# Altium PCB MS_PCB.PcbDoc (part 1 of 3)
Units mil, origin at the board's own origin, x right, y up, seen from the top; angles counter-clockwise.
Board outline 1232.38 x 1705 mil, 2 copper layers (Top Layer, Bottom Layer), stack 33 mil thick; 84 components, 60 nets, 313 pads, 105 vias.
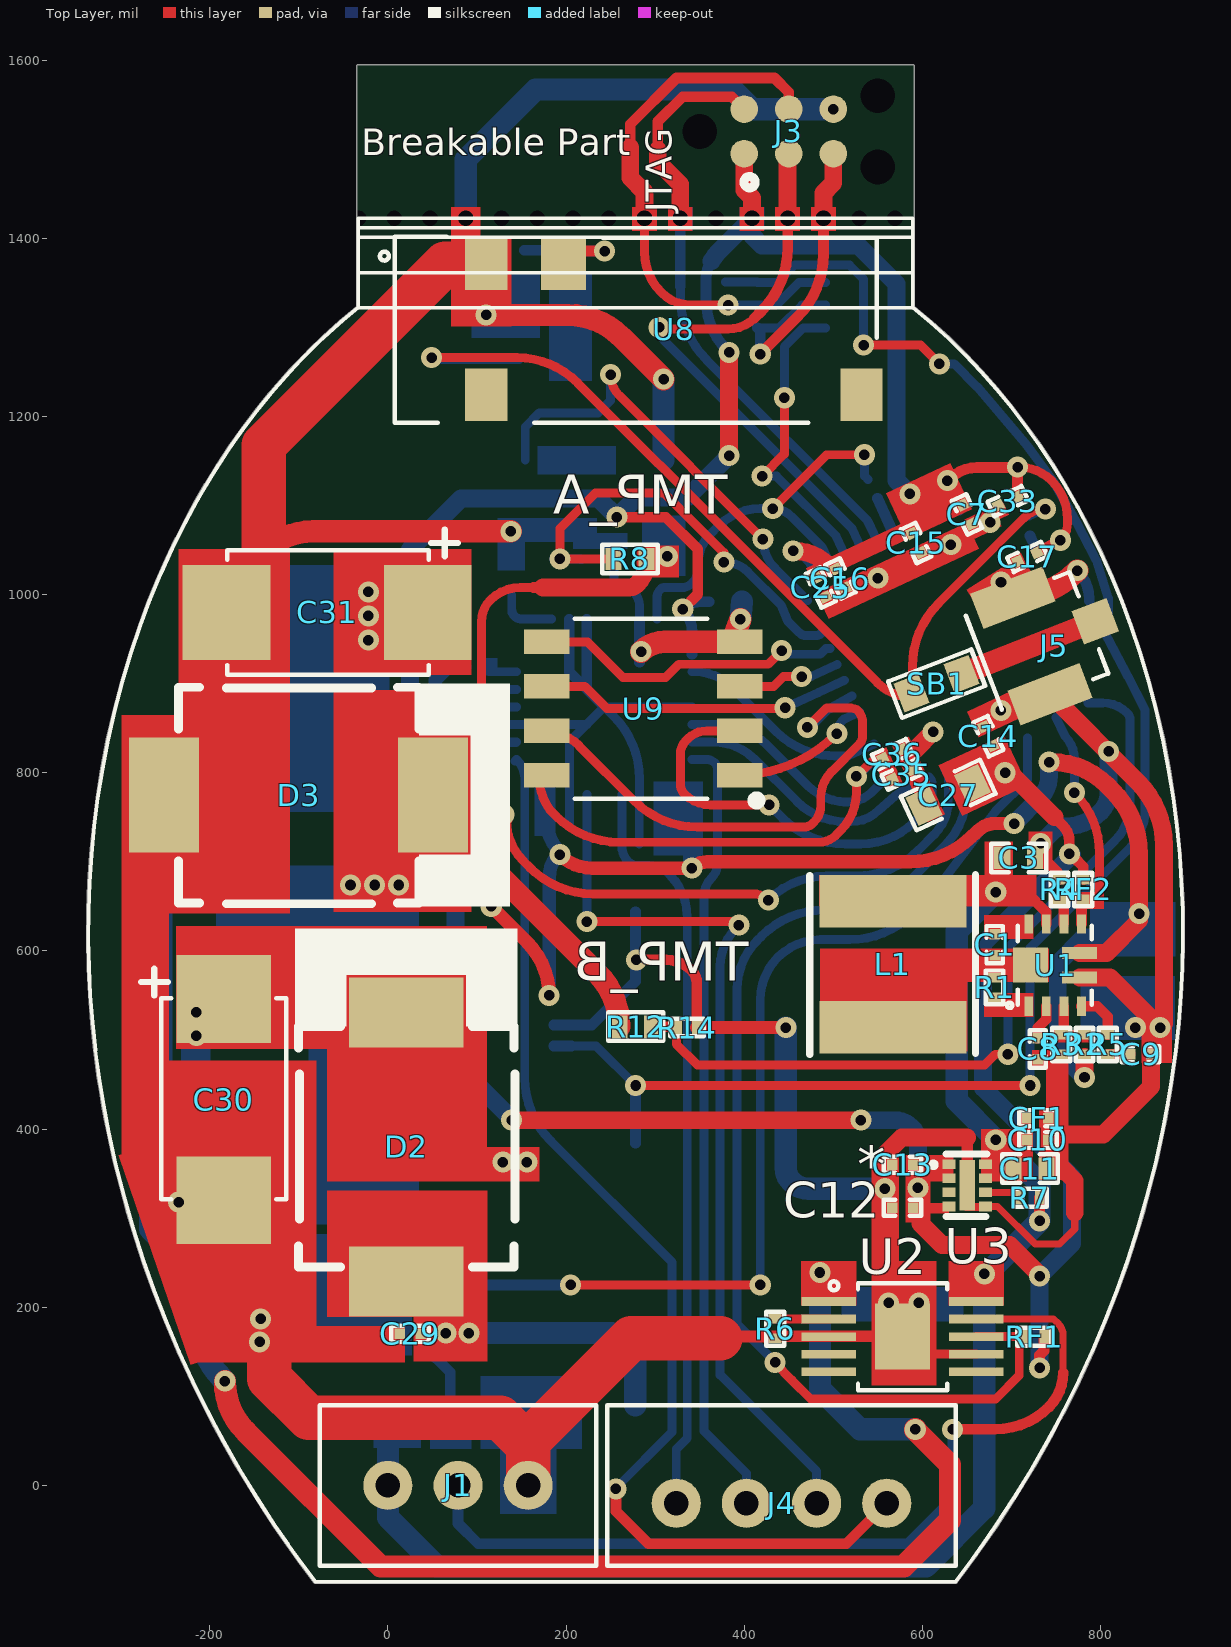
[diagram p0: Top Layer view]
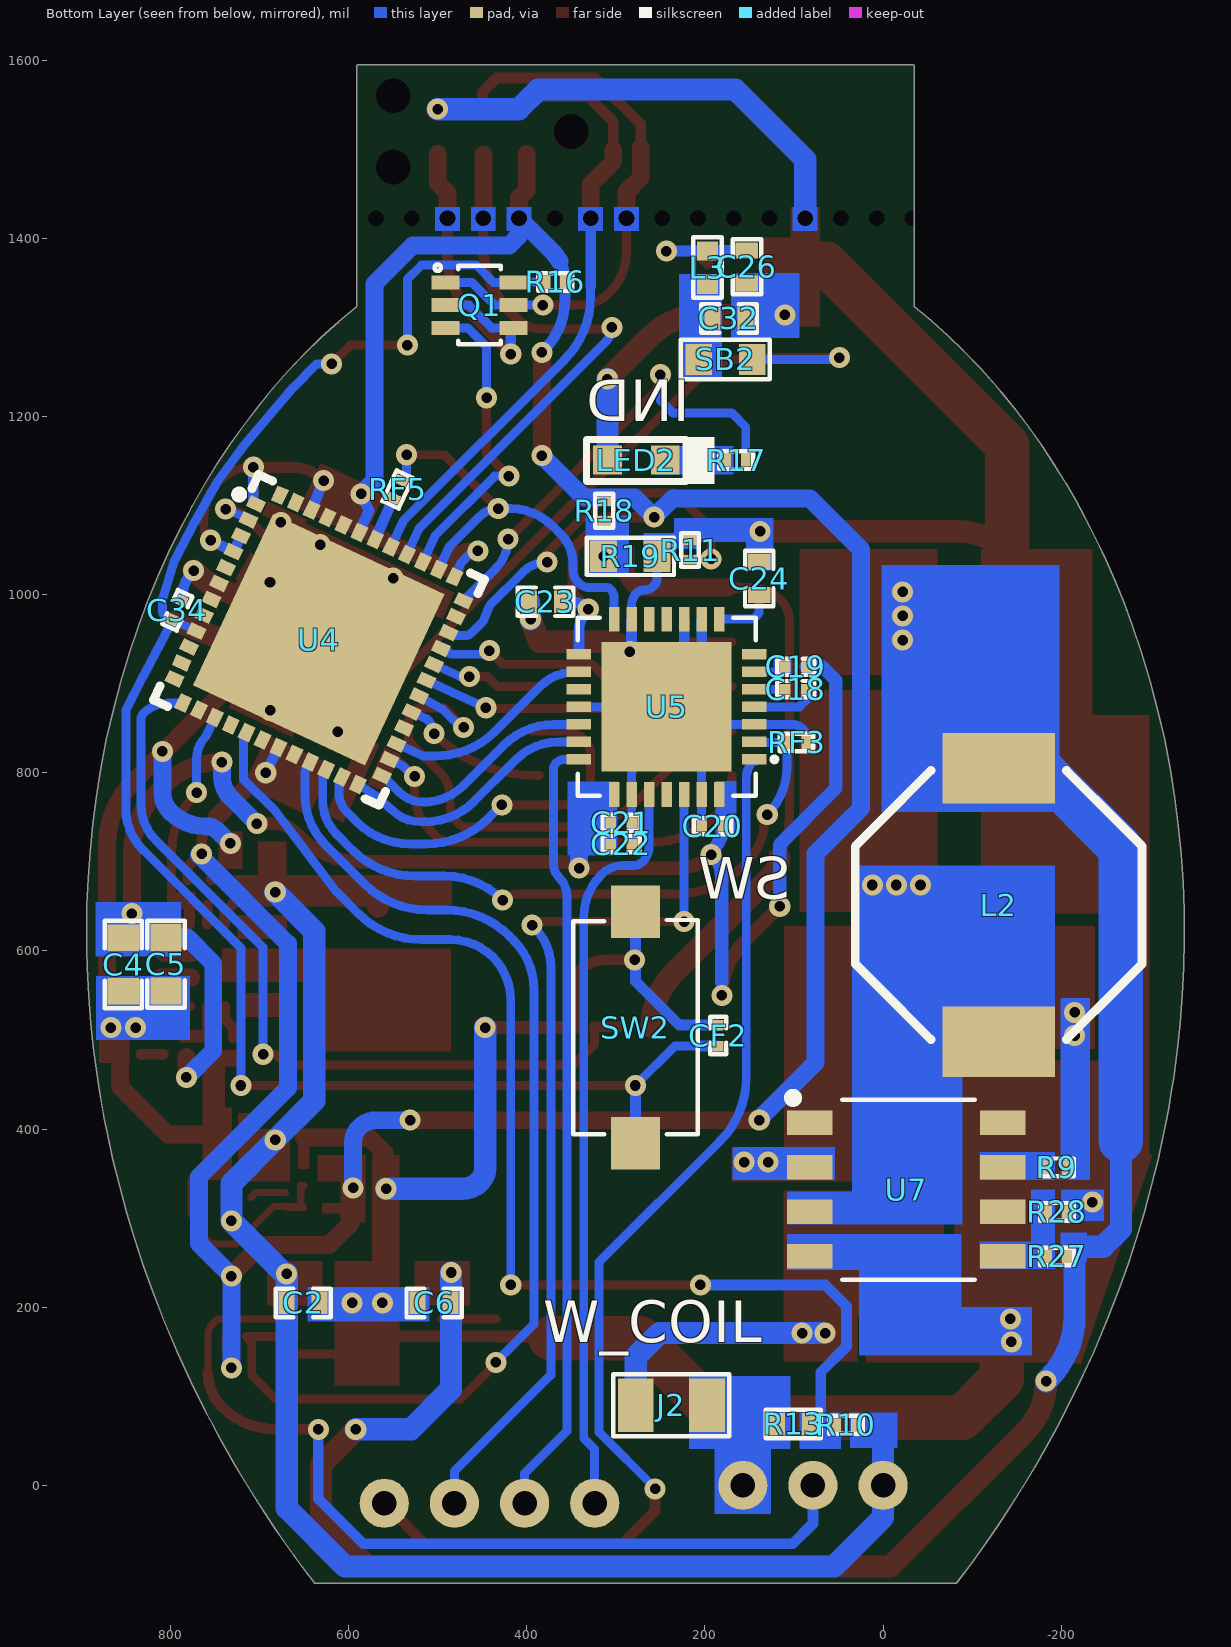
[diagram p1: Bottom Layer view, seen from below]
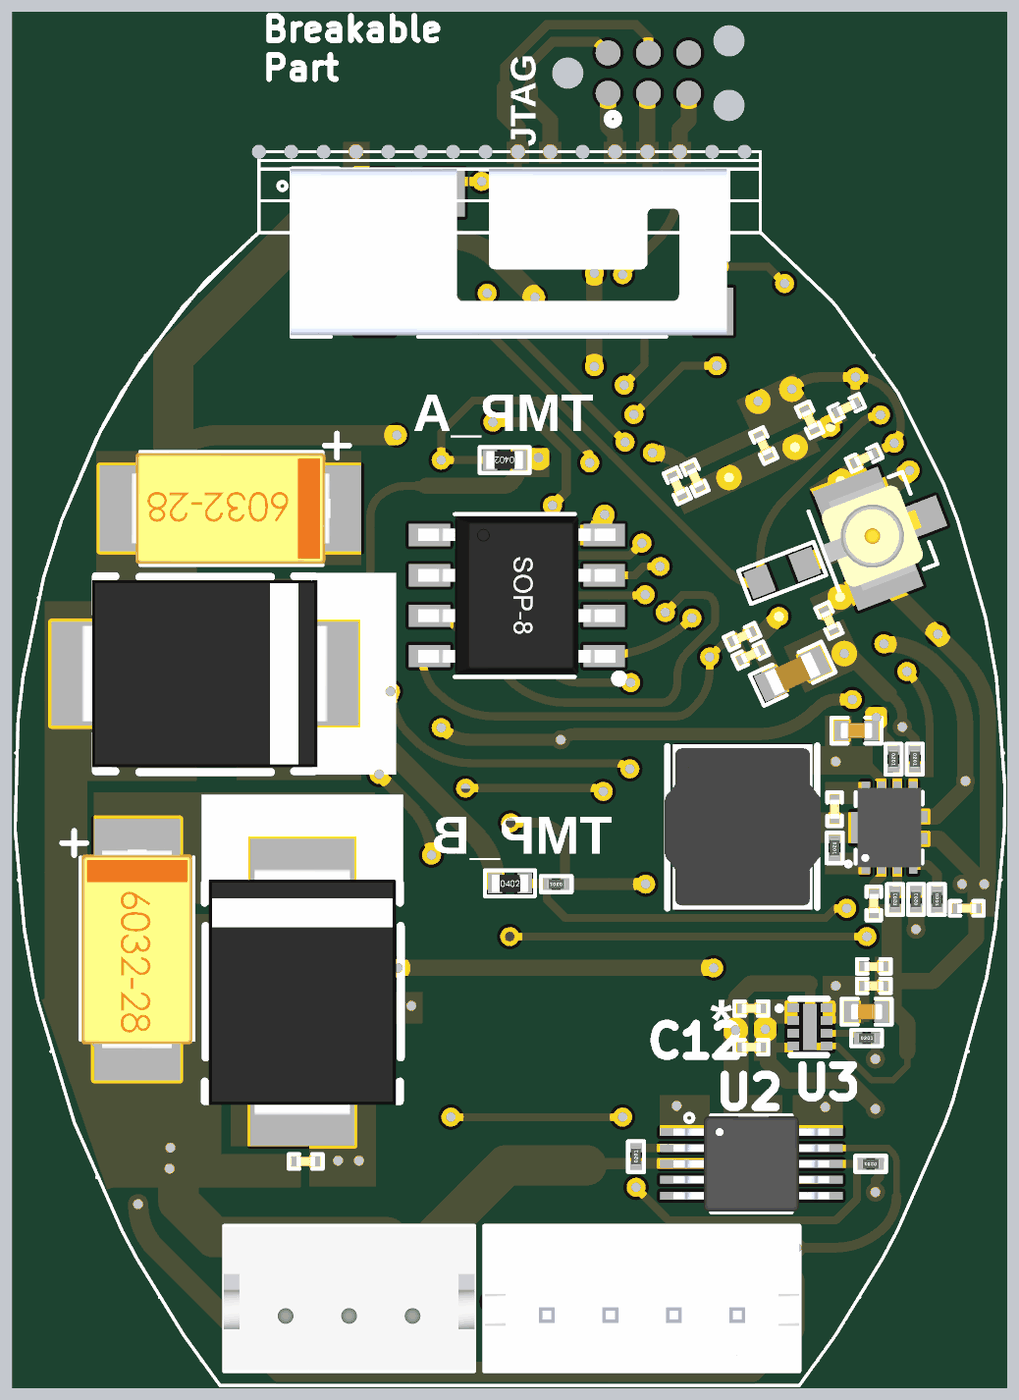
[diagram p3: 3D render of the assembled board from above, using the file's embedded part models]
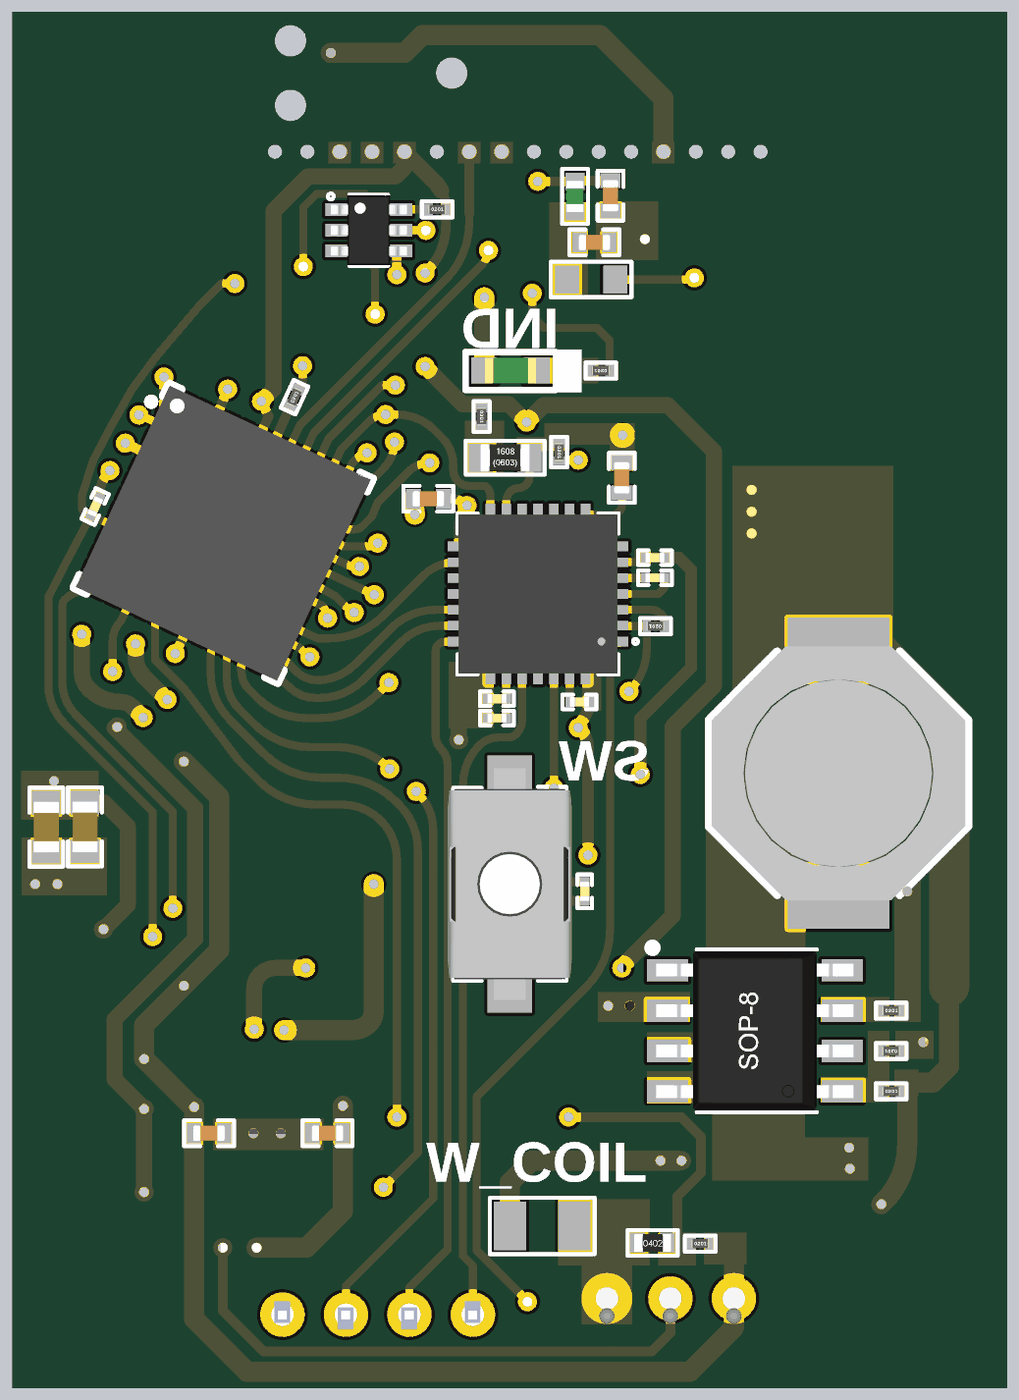
[diagram p4: 3D render of the assembled board from below, using the file's embedded part models]

## Layer stack, top to bottom
Top Solder: solder mask 3, Solder Resist, Dk 3.5
Top Layer: signal copper 5
Dielectric 1: dielectric 23, FR-4, Dk 4.8
Bottom Layer: signal copper 5
Bottom Solder: solder mask 3, Solder Resist, Dk 3.5

## Board outline
-293.13,305.88 ccw(c858.72,636.68) -264.08,217.75 cw(c-262.22,218.44) -264.08,217.75 ccw(c909.89,655.39) -204.6,82.98 ccw(c921.96,661.24) -186.04,48.17 cw(c-184.31,49.13) -186.04,48.17 ccw(c916.4,658.02) -158.14,0.25 ccw(c916.4,658.02) -128.14,-46.42 ccw(c874.13,629.41) -82.79,-109.23 ccw(c-81.22,-108.02) -81.2,-110 277.93,-110 637.07,-110.01 ccw(c637.07,-108.03) 638.73,-109.12 ccw(c-318.28,629.4) 657.44,-84.22 ccw(c-318.02,629.32) 661.75,-78.28 ccw(c660.21,-77.04) 661.88,-78.11 ccw(c660.21,-77.04) 661.89,-78.1 661.88,-78.11 ccw(c-318.02,629.32) 683.99,-46.43 ccw(c-360.55,658.02) 713.99,0.24 ccw(c-360.55,658.02) 741.9,48.16 cw(c740.16,49.12) 741.9,48.16 ccw(c-366.12,661.25) 751.52,65.89 ccw(c-366.12,661.25) 760.86,83.77 ccw(c-353.94,655.36) 819.94,217.74 ccw(c818.08,218.43) 819.95,217.76 ccw(c-302.87,636.69) 848.99,305.87 ccw(c-302.87,636.69) 871.13,395.99 ccw(c869.19,396.39) 871.13,395.99 ccw(c-257.71,626.57) 876.84,425.97 ccw(c-257.71,626.57) 881.76,456.1 ccw(c-227.5,622.39) 893.4,581.37 ccw(c891.42,581.45) 893.41,581.45 ccw(c891.42,581.45) 893.41,581.45 cw(c891.42,581.45) 893.41,581.45 893.4,581.37 ccw(c-176,620.9) 894.14,620.9 ccw(c-176,620.9) 883.42,771.95 ccw(c-106.57,631.05) 835.76,965.63 ccw(c-14.27,664.01) 761.28,1124.5 ccw(c759.57,1123.49) 761.28,1124.5 ccw(c79.8,719.56) 684.82,1231.75 ccw(c166.51,793.65) 591.01,1323.16 591.01,1593 ccw(c589.02,1593) 589.02,1594.98 -33.14,1594.98 ccw(c-33.14,1593) -35.12,1593 -35.12,1422.77 ccw(c-33.16,1422.49) -35.14,1422.49 -35.14,1323.15 ccw(c376.54,807.97) -90.41,1273.64 ccw(c389.31,793.66) -128.95,1231.75 -128.94,1231.76 ccw(c476.03,719.57) -133.75,1226.03 ccw(c446.94,741.51) -178.56,1166.61 ccw(c476.03,719.57) -205.4,1124.51 ccw(c-203.7,1123.5) -205.41,1124.49 cw(c570.11,664.01) -205.4,1124.51 -205.41,1124.49 ccw(c570.11,664.01) -226.34,1087.27 ccw(c556.7,669.88) -279.9,965.63 ccw(c662.4,631.04) -308.57,869.98 ccw(c662.4,631.04) -327.56,771.96 ccw(c731.84,620.89) -337.55,581.38 ccw(c783.15,622.37) -326.06,457.18 ccw(c813.41,626.54) -321.08,426.52 ccw(c813.41,626.54) -315.28,396.02 ccw(c-313.33,396.4) -315.27,396 ccw(c858.72,636.68)

## Design rules (kind name [scope] priority, off if disabled: settings)
Clearance [All] p1: gap=6 ignorepadtopadclearanceinfootprint=FALSE except(4.5: Arc-SMDPad Track-SMDPad SMDPad-SMDPad; 7: Arc-Arc Arc-Track Track-Track)
MinimumSolderMaskSliver [All] p1: minsoldermaskwidth=0
PolygonConnect [All] p1: connectstyle=Relief reliefconductorwidth=10 reliefentries=4 polygonreliefangle="90 Angle" airgapwidth=10
RoutingVias [All] p1: holewidth=11.81 width=23.62 viastyle="Through Hole" minholewidth=11.81 minwidth=23.62 maxholewidth=28 maxwidth=50
SilkToSilkClearance [All] p1: silktosilkclearance=0
SilkToSolderMaskClearance [IsPad] p1: minsilkscreentomaskgap=0 clearancetoexposedcopper=TRUE
SolderMaskExpansion [All] p1: expansion=4
Width [All] p1: maxlimit=100 minlimit=7 preferedwidth=10
27 further rules are at their usual default settings.

## Classes and differential pairs
component class U_Control_Sheet: C7 C14 C15 C16 C17 C25 C26 C27 C32 C33 C34 C35 C36 CF2 J5 L3 LED2 Q1 R16 R17 RF5 SB1 SB2 SW2 U4 U8 U9
component class "U_Wireless Charging Section": C29 C30 C31 D2 D3 L2 R9 R27 R28 U7
component class "U_Power Section": C1 C2 C3 C4 C5 C6 C8 C9 C10 C11 C12 C13 CF1 L1 R1 R2 R3 R4 R5 R6 R7 RF1 RF2 U1 U2 U3
component class "U_Driver Section": C18 C19 C20 C21 C22 C23 C24 RF3 U5
component class "U_Connector Section": J1 J2 J3 J4 R8 R10 R11 R12 R13 R14 R18 R19

## Components (designator, comment, footprint, x,y, rotation, side; value= is the part's Value field where it differs from the comment)
C1 "22nF" "CAP 0201" 681,607 r90 top
C2 "4.7uF" Cap0402 651,205 r0 bottom
C3 "4.7uF" Cap0402 708.15,704.5 r180 top
C4 "22uF" Cap0603 853,584.74 r90 bottom
C5 "22uF" Cap0603 805,585 r90 bottom
C6 "4.7uF" Cap0402 504,205 r180 bottom
C7 "0.1uF" "CAP 0201" 650,1090 r295 top
C8 "1uF" "CAP 0201" 729.65,490 r270 top locked
C9 "4.7nF" "Cap 0201" 845,484 r180 top locked
C10 "0.1uF" "CAP 0201" 729.74,387.75 r180 top
C11 "4.7uF" Cap0402 720.74,355.75 r180 top
C12 "0.1uF" "Cap 0201" 577.74,311.75 r180 top
C13 "1uF" "CAP 0201" 577.74,359.75 r180 top
C14 "0.1uF" "CAP 0201" 674,841 r115 top
C15 "0.1uF" "CAP 0201" 593,1058 r295 top
C16 "0.1uF" "CAP 0201" 508,1018 r295 top
C17 "0.1uF" "CAP 0201" 717.86,1042.3 r205 top locked
C18 "22nF" "CAP 0201" 98,894 r0 bottom
C19 "1uF" "CAP 0201" 98,919 r0 bottom
C20 "1uF" "CAP 0201" 191.5,740 r0 bottom
C21 "1uF" "CAP 0201" 294,744 r180 bottom
C22 "1uF" "CAP 0201" 294,720 r180 bottom
C23 "4.7uF" Cap0402 379,992 r180 bottom
C24 "4.7uF" Cap0402 139,1018 r270 bottom
C25 "0.1uF" "CAP 0201" 485.91,1008 r295 top
C26 "2.7pF" Cap0402 153,1368 r270 bottom
C27 "10uf" Cap0603 629,775 r205 top
C29 "10000pF" "CAP 0201" 25,170 r180 top
C30 "10uF" "Cap Case-C" -184.26,433 r90 top locked
C31 "10uF" "Cap Case-C" -68.26,980 r0 top locked
C32 "4.7pF" Cap0402 173,1310 r180 bottom
C33 "0.1uF" "CAP 0201" 696,1105 r205 top
C34 "1uF" "CAP 0201" 792.31,982.38 r115 bottom
C35 "1uF" "CAP 0201" 576.93,798 r25 top
C36 "0.1uF" "CAP 0201" 566.23,821 r25 top
CF1 "1uF" "Cap 0201" 729.74,412 r0 top
CF2 "0.1uF" "CAP 0201" 185,505 r90 bottom
D2 "SS34" SMC 20.74,380 r90 top locked
D3 "SS34" SMC -100.26,775 r0 top locked
J1 "B3B-PH-K-S(LF)(SN)" B3B-PH-K-S(LF)(SN) 78.74,0 r0 top locked
J2 "SMD PADS" "SMD PAD" 237.74,90 r180 bottom locked
J3 "TC2030-IDC" TC2030-IDC 450,1520 r0 top locked
J4 "B4B-PH-K-S(LF)(SN)" B4B-PH-K-S(LF)(SN) 402.48,-20 r0 top locked
J5 "U.FL-R-SMT-1(80)" U.FL-R-SMT-1(80) 760.06,956.97 r111 top locked
L1 "10µH" SRN5040TA-100M 567,585 r270 top locked
L2 "22uH" SRU8028-220Y -129.74,651.54 r270 bottom locked
L3 "1.6nH" "Ind 0402" 197,1367 r270 bottom
LED2 "IN-S63AT5UW" "LED 0603" 277,1151 r180 bottom locked
Q1 "UMH3NTN" SOT-363 453,1325 r180 bottom
R1 "150K" Res-0201 681,559 r270 top
R2 "178K" Res-0201 782,495 r90 top locked
R3 "24K" Res-0201 756,495 r90 top locked
R4 "150K" Res-0201 754,669 r270 top
R5 "18K" Res-0201 808,495 r270 top locked
R6 "1.1K" Res-0201 434.74,176 r90 top
R7 "" Res-0201 720.74,323 r0 top
R8 "B57230V2103F260" Res0402 271.74,1040 r180 top locked
R9 "100K" Res-0201 -195.17,357 r180 bottom
R10 "56K" Res-0201 41.74,68 r180 bottom
R11 "1K" Res-0201 216.74,1050 r270 bottom
R12 "B57230V2103F260" Res0402 278.24,515 r0 top locked
R13 "198K" Res0402 100.74,69 r180 bottom
R14 "1K" Res-0201 335.74,514 r180 top
R16 "10K" Res-0201 368,1351 r180 bottom
R17 "1.2k" Res-0201 165,1151 r0 bottom
R18 "100K" Res-0201 313,1094 r270 bottom
R19 "320K" Res0603 283.74,1043 r0 bottom locked
R27 "6.2K" Res-0201 -195.17,257 r180 bottom
R28 "2K" Res-0201 -195.17,307 r0 bottom
RF1 "10K" Res-0201 725.74,167 r180 top
RF2 "10K" Res-0201 780.53,669 r270 top
RF3 "10K" Res-0201 97.17,834 r0 bottom
RF5 "1K" Res-0201 545,1118 r115 bottom
SB1 "Solder Bridge" "Solder Bridge" 616,900 r21 top
SB2 "Solder Bridge" "Solder Bridge" 177,1264 r0 bottom
SW2 "434121025816" 434121025816 278,514 r90 bottom locked
U1 "TPS61089RNRT" TPS61089RNRT 749,584 r90 top locked
U2 "BQ24092DGQR" BQ24092DGQR 577.74,167 r0 top locked
U3 "NCP186AMX330TAG" NCP186AMX330TAG 650.41,336.87 r0 top locked
U4 "ESP32-PICO-D4" "48-SMD Module" 633.38,949.28 r205 bottom locked
U5 "TMC2209-LA-T'" QFN-28 243,874 r0 bottom locked
U7 "XKT-510 T3168" SOP-8 -26.01,332 r180 bottom locked
U8 "PRO-OB-440" PRO-OB-440 321,1298 r90 top locked
U9 "LY68L6400SLIT" SOP-8 286.73,872 r180 top locked value=Custom

## Footprints (in the part's own frame and the unit in brackets; to place one, negate y for a bottom-side part, rotate by r counter-clockwise, add the part's x,y. Pads: shape width x height; smd on the part's side, far side on the other; paste and mask are expansions set on the pad)
"48-SMD Module" [mm]
  rect 0.47x0.35 smd: 1(-3.265,2.75) 2(-3.265,2.25) 3(-3.265,1.75) 4(-3.265,1.25) 5(-3.265,0.75) 6(-3.265,0.25) 7(-3.265,-0.25) 8(-3.265,-0.75) 9(-3.265,-1.25) 10(-3.265,-1.75) 11(-3.265,-2.25) 12(-3.265,-2.75) 25(3.265,-2.75) 26(3.265,-2.25) 27(3.265,-1.75) 28(3.265,-1.25) 29(3.265,-0.75) 30(3.265,-0.25) 31(3.265,0.25) 32(3.265,0.75) 33(3.265,1.25) 34(3.265,1.75) 35(3.265,2.25) 36(3.265,2.75)
  rect 0.35x0.47 smd: 13(-2.75,-3.265) 14(-2.25,-3.265) 15(-1.75,-3.265) 16(-1.25,-3.265) 17(-0.75,-3.265) 18(-0.25,-3.265) 19(0.25,-3.265) 20(0.75,-3.265) 21(1.25,-3.265) 22(1.75,-3.265) 23(2.25,-3.265) 24(2.75,-3.265) 37(2.75,3.265) 38(2.25,3.265) 39(1.75,3.265) 40(1.25,3.265) 41(0.75,3.265) 42(0.25,3.265) 43(-0.25,3.265) 44(-0.75,3.265) 45(-1.25,3.265) 46(-1.75,3.265) 47(-2.25,3.265) 48(-2.75,3.265)
  rect 5.4x5.4 smd paste-4: 49(0,0)
  silkscreen extent -3.91,-3.55 3.55,3.55, body extent -3.5,-3.5 3.5,3.5, height 1.04
434121025816 [mm] "SWITCH TACTILE SPST-NO 0.05A 12V"
  rect 1.5x1.4 smd: 1(-3.3,0) 2(3.3,0)
  silkscreen extent -3.05,-1.78 3.07,1.78, body extent -3.65,-1.95 3.65,1.95, height 2.5
B3B-PH-K-S(LF)(SN) [mm] "CONN HEADER VERT 3POS 2MM"
  round 1.4 hole 0.7: 1(-2,0) 2(0,0) 3(2,0)
  silkscreen extent -3.94,-2.29 3.94,2.29, body extent -3.95,-2.25 3.95,2.25, height 6
B4B-PH-K-S(LF)(SN) [mm]
  round 1.4 hole 0.7: 1(-2,0) 2(0,0) 3(2,0) 4(4,0)
  silkscreen extent -3.96,-1.78 5.96,2.79, body extent -3.94,-1.72 5.96,2.78, height 6
BQ24092DGQR [mm] "IC BATT CHG LI-ION 1CELL 10MSOP"
  rect 1.55x0.25 smd: 1(-2.1,1) 2(-2.1,0.5) 3(-2.1,0) 4(-2.1,-0.5) 5(-2.1,-1) 6(2.1,-1) 7(2.1,-0.5) 8(2.1,0) 9(2.1,0.5) 10(2.1,1)
  rect 1.57x1.88 smd: 11(0,0)
  silkscreen extent -2.08,-1.52 1.27,1.57, body extent -2.45,-1.5 2.45,1.5, height 1.1
Cap0402 [mil]
  rect 18x25 smd mask+2.36: 1(-18.5,0) 2(18.5,0)
  silkscreen extent -31,-16 31,16, body extent -20,-10 20,10, height 19
Cap0603 [mil]
  rect 30x35 smd mask+2.36: 1(-30,0) 2(30,0)
  silkscreen extent -49,-21 49,21, body extent -32,-16 31,16, height 34
"CAP 0201" [mm]
  rect 0.3x0.3 smd mask+0.055: 1(-0.3,0) 2(0.3,0)
  silkscreen extent -0.53,-0.23 0.53,0.23, body extent -0.3,-0.15 0.3,0.15, height 0.28
"Cap 0201" [mm]
  rect 0.3x0.3 smd mask+0.055: 1(-0.3,0) 2(0.3,0)
  silkscreen extent -0.53,-0.23 0.53,0.23, body extent -0.3,-0.15 0.3,0.15, height 0.28
"Cap Case-C" [mm] "Case-C"
  rect 2.5x2.7 smd: 1(-2.87,0) 2(2.87,0)
  silkscreen extent -2.84,-1.78 3.73,2.36, body extent -3.15,-1.75 3.15,1.75, height 2.8
"Ind 0402" [mm]
  rect 0.55x0.6 smd: 1(-0.475,0) 2(0.475,0)
  silkscreen extent -0.86,-0.41 0.86,0.41, body extent -0.5,-0.28 0.5,0.27, height 0.48
"LED 0603" [mm]
  rect 0.82x0.82 smd: 1(-0.825,0) 2(0.825,0)
  silkscreen extent -1.42,-0.69 2.24,0.66, body extent -0.8,-0.4 0.8,0.4, height 0.38
NCP186AMX330TAG [mm]
  rect 0.37x0.28 smd: 1(-0.525,0.6) 2(-0.525,0.2) 3(-0.525,-0.2) 4(-0.525,-0.6) 5(0.525,-0.6) 6(0.525,-0.2) 7(0.525,0.2) 8(0.525,0.6)
  rect 0.44x1.44 smd: 9(0,0)
  silkscreen extent -1.02,-0.89 0.56,0.89, body extent -0.6,-0.8 0.6,0.8, height 0.39
PRO-OB-440 [mm] "RF ANT 2.4GHZ STAMPED MET SLD"
  rect 1.5x1.2 smd: 1(1.865,5.35) 3(-1.865,5.35) 4(-1.865,-5.35)
  rect 1.5x1.28 smd: 2(1.865,3.15)
  silkscreen extent -2.67,-5.79 2.63,8.38, body extent -2.62,-5.74 2.62,8.01, height 3.5
QFN-28 [mm] "IC MTR DRV 4.75-28V QFN28"
  rect 0.7x0.3 smd: 1(-2.5,1.5) 2(-2.5,1) 3(-2.5,0.5) 4(-2.5,0) 5(-2.5,-0.5) 6(-2.5,-1) 7(-2.5,-1.5) 15(2.5,-1.5) 16(2.5,-1) 17(2.5,-0.5) 18(2.5,0) 19(2.5,0.5) 20(2.5,1) 21(2.5,1.5)
  rect 0.3x0.7 smd: 8(-1.5,-2.5) 9(-1,-2.5) 10(-0.5,-2.5) 11(0,-2.5) 12(0.5,-2.5) 13(1,-2.5) 14(1.5,-2.5) 22(1.5,2.5) 23(1,2.5) 24(0.5,2.5) 25(0,2.5) 26(-0.5,2.5) 27(-1,2.5) 28(-1.5,2.5)
  rect 3.7x3.7 smd: 29(0,0)
  silkscreen extent -3.15,-2.54 2.54,2.54, body extent -2.5,-2.5 2.5,2.5, height 0.89
Res0402 [mil]
  rect 18x25 smd mask+4: 1(-18.5,0) 2(18.5,0)
  silkscreen extent -32,-17 32,16, body extent -23,-11 23,11, height 16
Res0603 [mil]
  rect 30x35 smd: 1(-30,0) 2(30,0)
  silkscreen extent -49,-21 49,21, body extent -31,-17 31,17, height 18
Res-0201 [mm]
  rect 0.27x0.37 smd: 1(-0.275,0) 2(0.275,0)
  silkscreen extent -0.48,-0.25 0.48,0.25, body extent -0.3,-0.15 0.3,0.15, height 0.29
SMC [mm] "DO-214AB(SMC) (FS PKG Code P7)"
  rect 2x3.27 smd: 1(-3.835,0) 2(3.835,0)
  silkscreen extent -3.43,-3.17 6.22,3.18, body extent -3.9,-2.95 3.9,2.95, height 2.45
"SMD PAD" [mil] "SMD 0805"
  rect 40x60 smd: 1(-40,0) 2(40,0)
  silkscreen extent -65,-35 65,35
"Solder Bridge" [mil] "Solder Bridge ON"
  rect 30x35 smd: 1(-30,0) 2(30,0)
  silkscreen extent -50,-22 50,22
SOP-8 [mm]
  rect 1.3x0.7 smd: 1(-2.75,1.905) 2(-2.75,0.635) 3(-2.75,-0.635) 4(-2.75,-1.905) 5(2.75,-1.905) 6(2.75,-0.635) 7(2.75,0.635) 8(2.75,1.905)
  silkscreen extent -3.36,-2.57 1.96,2.75, body extent -3.11,-2.5 3.11,2.5, height 1.87
SOT-363 [mm] "Dual Digital Transistors"
  rect 0.8x0.4 smd: 1(-0.97,0.65) 2(-0.97,0) 3(-0.97,-0.65) 4(0.97,-0.65) 5(0.97,0) 6(0.97,0.65)
  silkscreen extent -1.29,-1.12 0.61,1.16, body extent -1.2,-1.1 1.2,1.1, height 1.08
SRN5040TA-100M [mm] "FIXED IND 10UH 2.2A 56 MOHM SMD"
  rect 1.5x4.2 smd: 1(-1.8,0) 2(1.8,0)
  silkscreen extent -2.56,-2.37 2.57,2.35, body extent -2.6,-2.45 2.6,2.46, height 4.1
SRU8028-220Y [mm]
  rect 2x3.2 smd: 1(-3.9,0) 2(3.9,0)
  silkscreen extent -3.84,-4.09 3.84,4.09, body extent -4,-4 4,4, height 2.78
TC2030-IDC [mil] "CABLE ADAPTER 6 POS"
  round 30.98 smd: 1(-50,-25) 1(-50,-25) 2(-50,25) 3(0,-25) 4(0,25) 5(50,-25) 6(50,25)
  round 0 hole 39.02 unplated mask+4.02: MP5(-100,0) MP6(100,-40) MP7(100,40)
  silkscreen extent -50,-63 -38,-51
TPS61089RNRT [mm] "IC REG BOOST ADJ 7A 11VQFN"
  rect 0.55x0.25 smd: 1(-1.175,0.75) 2(-1.175,0.25) 3(-1.175,-0.25) 4(-1.175,-0.75) 7(1.175,-0.75) 8(1.175,-0.25) 9(1.175,0.25) 10(1.175,0.75)
  rect 0.35x1 smd: 5(-0.35,-0.7) 6(0.35,-0.7)
  rect 1x1 smd: 11(0,0.7)
  silkscreen extent -1.22,-1.05 1.13,1.37, body extent -1.25,-1 1.25,1, height 1
U.FL-R-SMT-1(80) [mm]
  rect 1.02x1.07 smd: 1(0,-0.923)
  rect 1.07x2.2 smd: 2(1.475,1.025) 3(-1.475,1.025)
  silkscreen extent -1.52,-0.74 1.57,2.46, body extent -1.47,-0.69 1.53,2.41, height 1.2

## Part data
C1 C18: library part TMK063BJ223KP-F, "CAP CER 0.022UF 25V X5R 0201", Case/Package=0201, Case Code (Metric)=0603, MANUFACTURER="Taiyo Yuden", Max Operating Temperature=85°C, Min Operating Temperature=-55°C, Supplier Part Number 1=587-6154-1-ND, Tolerance=10%, Voltage Rating=25V, Capacitance=22nF, Case Code (Imperial)=0201, Category="Ceramic Capacitors", ComponentLink1Description="https://ds.yuden.co.jp/TYCOMPAS/ut/detail?pn=TMK063BJ223KP-F &amp;u=M&src-supplier=Digi-Key", ComponentLink1URL="https://ds.yuden.co.jp/TYCOMPAS/ut/detail?pn=TMK063BJ223KP-F &amp;u=M&src-supplier=Digi-Key", ComponentLink2Description=http://ds.yuden.co.jp/TYCOMPAS/ut/detail.do?productNo=TMK063BJ223KP-F&amp;fileName=TMK063BJ223KP-F_SS&amp;mode=specSheetDownload&src-supplier=Digi-Key, ComponentLink2URL=http://ds.yuden.co.jp/TYCOMPAS/ut/detail.do?productNo=TMK063BJ223KP-F&amp;fileName=TMK063BJ223KP-F_SS&amp;mode=specSheetDownload&src-supplier=Digi-Key, Manufacturer Part Number=TMK063BJ223KP-F, Mount="Surface Mount", Packaging="Tape and Reel", Pricing 1="1=0.10000, 10=0.02100, 50=0.01120, 100=0.00920, 500=0.00654, 1000=0.00514, 2500=0.00468, 5000=0.00430 (USD)", RoHS=No, Stock 1=108943, Supplier 1=Digi-Key
C2 C3 C6 C11: library part GRM155R61A475MEAAD, "0402 10 V 4.7 uF ±20% Tolerance X5R Multilayer Ceramic Chip Capacitor", Case/Package=0402, Case Code (Metric)=1005, MANUFACTURER=Murata, Max Operating Temperature=85°C, Min Operating Temperature=-55°C, Tolerance=20%, Voltage Rating=10V, Capacitance=4.7uF, Case Code (Imperial)=0402, Category="Ceramic Capacitors", ComponentLink1Description=http://www.farnell.com/datasheets/2189109.pdf?src-supplier=Farnell, ComponentLink1URL=http://www.farnell.com/datasheets/2189109.pdf?src-supplier=Farnell, ComponentLink2Description=https://search.murata.co.jp/Ceramy/image/img/A01X/G101/ENG/GRM155R61A475MEAA-01.pdf?src-supplier=Digi-Key, ComponentLink2URL=https://search.murata.co.jp/Ceramy/image/img/A01X/G101/ENG/GRM155R61A475MEAA-01.pdf?src-supplier=Digi-Key, ComponentLink3Description=http://www.farnell.com/datasheets/2189109.pdf?src-supplier=Newark, ComponentLink3URL=http://www.farnell.com/datasheets/2189109.pdf?src-supplier=Newark, ComponentLink4Description=http://www.farnell.com/datasheets/2189109.pdf?src-supplier=Element14, ComponentLink4URL=http://www.farnell.com/datasheets/2189109.pdf?src-supplier=Element14, ComponentLink5Description=http://datasheet.octopart.com/GRM155R61A475MEAAD-Murata-datasheet-138740730.pdf?src-supplier=Ciiva+Crawler, ComponentLink5URL=http://datasheet.octopart.com/GRM155R61A475MEAAD-Murata-datasheet-138740730.pdf?src-supplier=Ciiva+Crawler, ComponentLink6Description=http://datasheet.octopart.com/GRM155R61A475MEAAD-Murata-datasheet-140690084.pdf?src-supplier=Ciiva+Crawler, ComponentLink6URL=http://datasheet.octopart.com/GRM155R61A475MEAAD-Murata-datasheet-140690084.pdf?src-supplier=Ciiva+Crawler, ComponentLink7Description=http://datasheet.octopart.com/GRM155R61A475MEAAD-Murata-datasheet-141266224.pdf?src-supplier=Ciiva+Crawler, ComponentLink7URL=http://datasheet.octopart.com/GRM155R61A475MEAAD-Murata-datasheet-141266224.pdf?src-supplier=Ciiva+Crawler, ComponentLink8Description=http://datasheet.octopart.com/GRM155R61A475MEAAD-Murata-datasheet-68589269.pdf?src-supplier=Newark, ComponentLink8URL=http://datasheet.octopart.com/GRM155R61A475MEAAD-Murata-datasheet-68589269.pdf?src-supplier=Newark, ComponentLink9Description=http://datasheet.octopart.com/GRM155R61A475MEAAD-Murata-datasheet-8819587.pdf, ComponentLink9URL=http://datasheet.octopart.com/GRM155R61A475MEAAD-Murata-datasheet-8819587.pdf, ComponentLink10Description=http://datasheet.octopart.com/GRM155R61A475MEAAD-Murata-datasheet-10025737.pdf, ComponentLink10URL=http://datasheet.octopart.com/GRM155R61A475MEAAD-Murata-datasheet-10025737.pdf, ComponentLink11Description=http://datasheet.octopart.com/GRM155R61A475MEAAD-Murata-datasheet-11978611.pdf, ComponentLink11URL=http://datasheet.octopart.com/GRM155R61A475MEAAD-Murata-datasheet-11978611.pdf, ComponentLink12Description=http://datasheet.octopart.com/GRM155R61A475MEAAD-Murata-datasheet-12510076.pdf, ComponentLink12URL=http://datasheet.octopart.com/GRM155R61A475MEAAD-Murata-datasheet-12510076.pdf, ComponentLink13Description=http://datasheet.octopart.com/GRM155R61A475MEAAD-Murata-datasheet-12515295.pdf, ComponentLink13URL=http://datasheet.octopart.com/GRM155R61A475MEAAD-Murata-datasheet-12515295.pdf, Manufacturer Part Number=GRM155R61A475MEAAD, Mount="Surface Mount", Packaging="Tape and Reel", Pricing 1="1=0.15280, 100000=0.02590, 1000000=0.02570, 10000000=0.02490 (USD)", Stock 1=5, Supplier 1="Arrow Electronics", Supplier Part Number 1=GRM155R61A475MEAAD
C4 C5: library part GRM187R61A226ME15D, "CAP CER 22UF 10V X5R 0603", Case/Package=0603, Case Code (Metric)=1608, Dielectric=X5R, MANUFACTURER=Murata, Max Operating Temperature=85°C, Min Operating Temperature=-55°C, Supplier Part Number 1=490-13243-1-ND, Tolerance=20%, Voltage Rating=10V, Capacitance=22uF, Case Code (Imperial)=0603, Category="Ceramic Capacitors", ComponentLink1Description=http://search.murata.co.jp/Ceramy/image/img/A01X/G101/ENG/GRM187R61A226ME15-01.pdf?src-supplier=Digi-Key, ComponentLink1URL=http://search.murata.co.jp/Ceramy/image/img/A01X/G101/ENG/GRM187R61A226ME15-01.pdf?src-supplier=Digi-Key, Length=0.063inch, Manufacturer Part Number=GRM187R61A226ME15D, Mount="Surface Mount", Packaging="Tape and Reel", Pricing 1="1=0.52000, 10=0.36500, 50=0.27580, 100=0.24030, 500=0.17798, 1000=0.15128 (USD)", RoHS=Yes, RoHS Compliant=Yes, Stock 1=93992, Supplier 1=Digi-Key, Thickness=0.031inch, Voltage Rating (DC)=10V, Width=0.031inch
C7 C10 C12 C14 C15 C16 C17 C25 C33 C36 CF2: library part GRM033R6YA104ME14D, "CAP CER 0.1UF 35V X5R 0201", Capacitance=100nF, Case/Package=0201, Case Code (Metric)=0603, Dielectric=X5R, MANUFACTURER=Murata, Max Operating Temperature=85°C, Min Operating Temperature=-55°C, Package Quantity=15000, Supplier Part Number 1=490-10431-1-ND, Tolerance=20%, Voltage Rating=35V, Case Code (Imperial)=0201, Category="Ceramic Capacitors", ComponentLink1Description=http://www.mouser.com/ds/2/281/c02e-2905.pdf?src-supplier=Mouser, ComponentLink1URL=http://www.mouser.com/ds/2/281/c02e-2905.pdf?src-supplier=Mouser, ComponentLink2Description=http://search.murata.co.jp/Ceramy/image/img/A01X/G101/ENG/GRM033R6YA104ME14-01.pdf?src-supplier=Digi-Key, ComponentLink2URL=http://search.murata.co.jp/Ceramy/image/img/A01X/G101/ENG/GRM033R6YA104ME14-01.pdf?src-supplier=Digi-Key, Height=0.3mm, Length=0.024inch, Manufacturer Part Number=GRM033R6YA104ME14D, Mount="Surface Mount", Packaging="Tape and Reel", RoHS=Yes, Supplier 1=Digi-Key, Termination=SMD/SMT, Thickness=0.013inch, Voltage Rating (DC)=35V, Weight=1.2E-05oz, Width=0.012inch
  C7 C12 C14 C15 C16 C17 C25 C33 C36 CF2: Pricing 1="1=0.10000, 10=0.05600, 50=0.03040, 100=0.02490, 500=0.01778, 1000=0.01398, 2500=0.01270, 5000=0.01169 (USD)", Stock 1=49800
  C10: Pricing 1="1=0.10000, 10=0.05100, 50=0.02780, 100=0.02260, 500=0.01616, 1000=0.01270, 2500=0.01155, 5000=0.01063 (USD)", RoHS Compliant=Yes, Stock 1=173583
C8 C13 C19 C20 C21 C22 C34 C35 CF1: library part CL03A105MO3NRNH, "CAP CER 1UF 16V X5R 0201", Case/Package=0201, Case Code (Metric)=0603, MANUFACTURER=Samsung, Max Operating Temperature=85°C, Min Operating Temperature=-55°C, Supplier Part Number 1=1276-6798-1-ND, Tolerance=20%, Voltage Rating=16V, Capacitance=1uF, Case Code (Imperial)=0201, Category="Ceramic Capacitors", ComponentLink1Description=http://www.samsungsem.com/kr/support/product-search/mlcc/CL03A105MO3NRNH.jsp?src-supplier=Digi-Key, ComponentLink1URL=http://www.samsungsem.com/kr/support/product-search/mlcc/CL03A105MO3NRNH.jsp?src-supplier=Digi-Key, Length=0.024inch, Manufacturer Part Number=CL03A105MO3NRNH, Mount="Surface Mount", Packaging="Tape and Reel", RoHS=Yes, Supplier 1=Digi-Key, Thickness=0.013inch, Width=0.012inch
  C8 C13 C19 C20 C21 C22 C34 C35: Pricing 1="1=0.27000, 10=0.18500, 50=0.11080, 100=0.09360, 500=0.06406, 1000=0.05667, 2500=0.05421, 5000=0.04928 (USD)", RoHS Compliant=Yes, Stock 1=66067
  CF1: Pricing 1="1=0.28000, 10=0.19000, 50=0.11380, 100=0.09610, 500=0.06578, 1000=0.05819, 2500=0.05566, 5000=0.05060 (USD)", Stock 1=1602977
C9: library part GRM033R61E472MA12D, "CAP CER 4700PF 25V X5R 0201", Case/Package=0201, Case Code (Metric)=0603, Dielectric=X5R, MANUFACTURER=Murata, Max Operating Temperature=85°C, Min Operating Temperature=-55°C, Package Quantity=15000, Supplier Part Number 1=490-9994-1-ND, Tolerance=20%, Voltage Rating=25V, Capacitance=4.7nF, Case Code (Imperial)=0201, Category="Ceramic Capacitors", ComponentLink1Description=http://www.mouser.com/ds/2/281/c02e-2905.pdf?src-supplier=Mouser, ComponentLink1URL=http://www.mouser.com/ds/2/281/c02e-2905.pdf?src-supplier=Mouser, ComponentLink2Description=http://search.murata.co.jp/Ceramy/image/img/A01X/partnumbering_e_01.pdf?src-supplier=Digi-Key, ComponentLink2URL=http://search.murata.co.jp/Ceramy/image/img/A01X/partnumbering_e_01.pdf?src-supplier=Digi-Key, ComponentLink3Description=http://search.murata.co.jp/Ceramy/image/img/A01X/G101/ENG/GRM033R61E472MA12-01.pdf?src-supplier=Digi-Key, ComponentLink3URL=http://search.murata.co.jp/Ceramy/image/img/A01X/G101/ENG/GRM033R61E472MA12-01.pdf?src-supplier=Digi-Key, Height=0.3mm, Length=0.024inch, Manufacturer Part Number=GRM033R61E472MA12D, Mount="Surface Mount", Packaging="Tape and Reel", Pricing 1="1=0.10000, 10=0.01300, 50=0.00720, 100=0.00590, 500=0.00424, 1000=0.00333, 2500=0.00302, 5000=0.00278 (USD)", RoHS=Yes, Stock 1=58014, Supplier 1=Digi-Key, Termination=SMD/SMT, Thickness=0.013inch, Voltage Rating (DC)=25V, Weight=1.2E-05oz, Width=0.3mm
C23 C24: library part GRM155R61A475MEAAD, "CAP CER 4.7UF 10V X5R 0402", Case/Package=0402, Case Code (Metric)=1005, MANUFACTURER=Murata, Max Operating Temperature=85°C, Min Operating Temperature=-55°C, Tolerance=20%, Voltage Rating=10V, Capacitance=4.7uF, Case Code (Imperial)=0402, Category="Ceramic Capacitors", ComponentLink1Description=http://www.farnell.com/datasheets/2189109.pdf?src-supplier=Farnell, ComponentLink1URL=http://www.farnell.com/datasheets/2189109.pdf?src-supplier=Farnell, ComponentLink2Description=https://search.murata.co.jp/Ceramy/image/img/A01X/G101/ENG/GRM155R61A475MEAA-01.pdf?src-supplier=Digi-Key, ComponentLink2URL=https://search.murata.co.jp/Ceramy/image/img/A01X/G101/ENG/GRM155R61A475MEAA-01.pdf?src-supplier=Digi-Key, ComponentLink3Description=http://www.farnell.com/datasheets/2189109.pdf?src-supplier=Newark, ComponentLink3URL=http://www.farnell.com/datasheets/2189109.pdf?src-supplier=Newark, ComponentLink4Description=http://www.farnell.com/datasheets/2189109.pdf?src-supplier=Element14, ComponentLink4URL=http://www.farnell.com/datasheets/2189109.pdf?src-supplier=Element14, ComponentLink5Description=http://datasheet.octopart.com/GRM155R61A475MEAAD-Murata-datasheet-138740730.pdf?src-supplier=Ciiva+Crawler, ComponentLink5URL=http://datasheet.octopart.com/GRM155R61A475MEAAD-Murata-datasheet-138740730.pdf?src-supplier=Ciiva+Crawler, ComponentLink6Description=http://datasheet.octopart.com/GRM155R61A475MEAAD-Murata-datasheet-140690084.pdf?src-supplier=Ciiva+Crawler, ComponentLink6URL=http://datasheet.octopart.com/GRM155R61A475MEAAD-Murata-datasheet-140690084.pdf?src-supplier=Ciiva+Crawler, ComponentLink7Description=http://datasheet.octopart.com/GRM155R61A475MEAAD-Murata-datasheet-141266224.pdf?src-supplier=Ciiva+Crawler, ComponentLink7URL=http://datasheet.octopart.com/GRM155R61A475MEAAD-Murata-datasheet-141266224.pdf?src-supplier=Ciiva+Crawler, ComponentLink8Description=http://datasheet.octopart.com/GRM155R61A475MEAAD-Murata-datasheet-68589269.pdf?src-supplier=Newark, ComponentLink8URL=http://datasheet.octopart.com/GRM155R61A475MEAAD-Murata-datasheet-68589269.pdf?src-supplier=Newark, ComponentLink9Description=http://datasheet.octopart.com/GRM155R61A475MEAAD-Murata-datasheet-8819587.pdf, ComponentLink9URL=http://datasheet.octopart.com/GRM155R61A475MEAAD-Murata-datasheet-8819587.pdf, ComponentLink10Description=http://datasheet.octopart.com/GRM155R61A475MEAAD-Murata-datasheet-10025737.pdf, ComponentLink10URL=http://datasheet.octopart.com/GRM155R61A475MEAAD-Murata-datasheet-10025737.pdf, ComponentLink11Description=http://datasheet.octopart.com/GRM155R61A475MEAAD-Murata-datasheet-11978611.pdf, ComponentLink11URL=http://datasheet.octopart.com/GRM155R61A475MEAAD-Murata-datasheet-11978611.pdf, ComponentLink12Description=http://datasheet.octopart.com/GRM155R61A475MEAAD-Murata-datasheet-12510076.pdf, ComponentLink12URL=http://datasheet.octopart.com/GRM155R61A475MEAAD-Murata-datasheet-12510076.pdf, ComponentLink13Description=http://datasheet.octopart.com/GRM155R61A475MEAAD-Murata-datasheet-12515295.pdf, ComponentLink13URL=http://datasheet.octopart.com/GRM155R61A475MEAAD-Murata-datasheet-12515295.pdf, Manufacturer Part Number=GRM155R61A475MEAAD, Mount="Surface Mount", Packaging="Tape and Reel", Pricing 1="1=0.15280, 100000=0.02590, 1000000=0.02570, 10000000=0.02490 (USD)", Stock 1=5, Supplier 1="Arrow Electronics", Supplier Part Number 1=GRM155R61A475MEAAD
C26: library part 04023A2R7BAT2A, "CAP CER 2.7PF 25V NP0 0402", Case/Package=0402, Case Code (Metric)=1005, Dielectric=C0G, MANUFACTURER="Kyocera AVX", Max Operating Temperature=125°C, Min Operating Temperature=-55°C, Package Quantity=10000, Supplier Part Number 1=478-12612-6-ND, Temperature Coefficient=0ppm/°C, Voltage Rating=25V, Capacitance=2.7pF, Case Code (Imperial)=0402, ComponentLink1Description=http://datasheets.avx.com/C0GNP0-Dielectric.pdf?src-supplier=Digi-Key, ComponentLink1URL=http://datasheets.avx.com/C0GNP0-Dielectric.pdf?src-supplier=Digi-Key, ComponentLink2Description=http://www.avx.com/docs/Catalogs/ccog.pdf?src-supplier=Future+Electronics, ComponentLink2URL=http://www.avx.com/docs/Catalogs/ccog.pdf?src-supplier=Future+Electronics, ComponentLink3Description=http://www.avxcorp.com/docs/Catalogs/ccog.pdf?src-supplier=Avnet, ComponentLink3URL=http://www.avxcorp.com/docs/Catalogs/ccog.pdf?src-supplier=Avnet, Depth=0.5mm, Lead Free="Lead Free", Length=1mm, Manufacturer Part Number=04023A2R7BAT2A, Mount="Surface Mount", Packaging="Tape and Reel", Pricing 1="1=0.32, 10=0.218, 50=0.1452, 100=0.1234, 500=0.08712, 1000=0.07623, 2500=0.0726, 5000=0.06716 (USD)", Radiation Hardening=No, Stock 1=28479, Supplier 1=Digi-Key, Termination=SMD/SMT, Thickness=0.022inch, Voltage Rating (DC)=25V, Width=0.02inch
C27: library part GRM188R61E106KA73D, "CAP CER 10UF 25V X5R 0603", Case/Package=0603, MANUFACTURER=Murata, Supplier Part Number 1=490-18214-6-ND, ComponentLink1Description=https://search.murata.co.jp/Ceramy/image/img/A01X/G101/ENG/GRM188R61E106KA73-01.pdf?src-supplier=Digi-Key, ComponentLink1URL=https://search.murata.co.jp/Ceramy/image/img/A01X/G101/ENG/GRM188R61E106KA73-01.pdf?src-supplier=Digi-Key, Manufacturer Part Number=GRM188R61E106KA73D, Pricing 1="1=0.32, 10=0.225, 50=0.1574, 100=0.135, 500=0.10122, 1000=0.08548 (USD)", Stock 1=20478, Supplier 1=Digi-Key
C29: library part CC0201KRX7R8BB103, "CAP CER X7R 0201", MANUFACTURER=Yageo, Supplier Part Number 1=13-CC0201KRX7R8BB103CT-ND, Manufacturer Part Number=CC0201KRX7R8BB103, Pricing 1="1=0.10000, 10=0.02800, 50=0.01520, 100=0.01240, 500=0.00886, 1000=0.00696, 2500=0.00632, 5000=0.00582 (USD)", RoHS=Yes, RoHS Compliant=Yes, Stock 1=19600, Supplier 1=Digi-Key
C30 C31: library part 293D106X0025C2TE3, "CAP TANT 10UF 20% 25V 2312", Case/Package=Molded, Case Code (Imperial)=2312, Case Code (Metric)=6032, Dielectric Material=Tantalum, ESR (Equivalent Series Resistance)=1.5R, Leakage Current=2.5uA, MANUFACTURER="Vishay Sprague", Max Operating Temperature=125°C, Min Operating Temperature=-55°C, Package Quantity=1, Ripple Current=190mA, Supplier Part Number 1=718-1044-1-ND, Tolerance=20%, Voltage Rating=25V, Capacitance=10uF, Category="Tantalum Capacitors", ComponentLink1Description=https://datasheet.ciiva.com/258/293d-258835.pdf?src-supplier=Digi-Key, ComponentLink1URL=https://datasheet.ciiva.com/258/293d-258835.pdf?src-supplier=Digi-Key, ComponentLink2Description=https://datasheet.ciiva.com/15163/getdatasheetpartid-87477-15163227.pdf?src-supplier=Verical, ComponentLink2URL=https://datasheet.ciiva.com/15163/getdatasheetpartid-87477-15163227.pdf?src-supplier=Verical, ComponentLink3Description=https://datasheet.ciiva.com/16508/293d-16508059.pdf?src-supplier=Future+Electronics, ComponentLink3URL=https://datasheet.ciiva.com/16508/293d-16508059.pdf?src-supplier=Future+Electronics, ComponentLink4Description=https://datasheet.ciiva.com/3003/293d-3003820.pdf?src-supplier=Avnet, ComponentLink4URL=https://datasheet.ciiva.com/3003/293d-3003820.pdf?src-supplier=Avnet, ComponentLink5Description=https://datasheet.ciiva.com/18444/70212567-18444876.pdf?src-supplier=Allied+Electronics, ComponentLink5URL=https://datasheet.ciiva.com/18444/70212567-18444876.pdf?src-supplier=Allied+Electronics, ComponentLink6Description=https://datasheet.ciiva.com/46382/1796648-46382044.pdf?src-supplier=Element14, ComponentLink6URL=https://datasheet.ciiva.com/46382/1796648-46382044.pdf?src-supplier=Element14, ComponentLink7Description=https://datasheet.ciiva.com/11244/293d-11244094.pdf?src-supplier=Avnet, ComponentLink7URL=https://datasheet.ciiva.com/11244/293d-11244094.pdf?src-supplier=Avnet, ComponentLink8Description=https://datasheet.ciiva.com/16631/293d-16631759.pdf?src-supplier=Avnet+Europe, ComponentLink8URL=https://datasheet.ciiva.com/16631/293d-16631759.pdf?src-supplier=Avnet+Europe, ComponentLink9Description=https://datasheet.ciiva.com/258/293d-258834.pdf?src-supplier=Digi-Key, ComponentLink9URL=https://datasheet.ciiva.com/258/293d-258834.pdf?src-supplier=Digi-Key, ComponentLink10Description=https://datasheet.ciiva.com/258/293d-258836.pdf?src-supplier=Digi-Key, ComponentLink10URL=https://datasheet.ciiva.com/258/293d-258836.pdf?src-supplier=Digi-Key, ComponentLink11Description=https://datasheet.ciiva.com/12884/293d-239871-12884366.pdf?src-supplier=Mouser, ComponentLink11URL=https://datasheet.ciiva.com/12884/293d-239871-12884366.pdf?src-supplier=Mouser, Construction=Flat, Depth=3.2mm, Dissipation Factor=6%, Features="General Purpose", Height=2.5mm, Height - Seated (Max)=0.11inch, Lead Free="Lead Free", Length=6mm, Manufacturer Part Number=293D106X0025C2TE3, Mount="Surface Mount,PCB", Number of Pins=2, Packaging="Tape and Reel", Polarity=Polar, Pricing 1="1=0.45000, 10=0.31600, 50=0.23920, 100=0.20840 (USD)", Radiation Hardening=No, REACH SVHC=Unknown, RoHS=Yes, RoHS Compliant=Yes, Series="TANTAMOUNT® 293D", Stock 1=14194, Supplier 1=Digi-Key, Termination=SMD/SMT, Voltage Rating (DC)=25V, Width=0.126inch
C32: library part 885012005023, "CAP CER 4.7PF 16V C0G/NP0 0402", Case/Package=0402, Case Code (Metric)=1005, MANUFACTURER="Wurth Electronics", Max Operating Temperature=125°C, Min Operating Temperature=-55°C, Supplier Part Number 1=732-7439-6-ND, Voltage Rating=16V, Capacitance=4.7pF, Case Code (Imperial)=0402, ComponentLink1Description=https://katalog.we-online.de/pbs/datasheet/885012005023.pdf?src-supplier=Digi-Key, ComponentLink1URL=https://katalog.we-online.de/pbs/datasheet/885012005023.pdf?src-supplier=Digi-Key, ComponentLink2Description=http://www.farnell.com/datasheets/2546554.pdf?src-supplier=Farnell, ComponentLink2URL=http://www.farnell.com/datasheets/2546554.pdf?src-supplier=Farnell, ComponentLink3Description=http://www.farnell.com/datasheets/2546554.pdf?src-supplier=Newark, ComponentLink3URL=http://www.farnell.com/datasheets/2546554.pdf?src-supplier=Newark, ComponentLink4Description=http://www.farnell.com/datasheets/2546554.pdf?src-supplier=Element14, ComponentLink4URL=http://www.farnell.com/datasheets/2546554.pdf?src-supplier=Element14, Length=0.039inch, Manufacturer Part Number=885012005023, Mount="Surface Mount", Packaging="Cut Tape", Pricing 1="1=0.1, 10=0.015, 100=0.0134, 500=0.01188 (USD)", Stock 1=8921, Supplier 1=Digi-Key, Thickness=0.022inch, Width=0.02inch
D2 D3: "DIODE SCHOTTKY 40V 3A DO214AB", Average Rectified Current=3A, Case/Package=SMC, Forward Voltage=500mV, MANUFACTURER="Vishay Semiconductors", Manufacturer Part Number=SS34-E3/57T, Max Forward Surge Current (Ifsm)=100A, Max Operating Temperature=125°C, Max Repetitive Reverse Voltage (Vrrm)=40V, Max Reverse Current=500uA, Min Operating Temperature=-55°C, Package Quantity=1, Supplier Part Number 1=SS34-E3/57TGICT-ND, Category="Rectifier Diodes", Contact Plating=Tin,Matte, Current=3A, Current Rating=3A, Element Configuration=Single, Forward Current=3A, Height=2.417mm, Lead Free="Lead Free", Length=7.11mm, Max Reverse Leakage Current=500uA, Max Reverse Voltage (DC)=40V, Max Surge Current=100A, Mount="Surface Mount", Number of Pins=2, Output Current=3A, Packaging="Tape and Reel", Peak Non-Repetitive Surge Current=100A, Polarity=Standard, Pricing 1="1=0.53000, 10=0.45400, 100=0.31530 (USD)", Radiation Hardening=No, REACH SVHC=Unknown, RoHS=Yes, Stock 1=17665, Supplier 1=Digi-Key, Voltage=40V, Voltage Rating (DC)=40V, Width=6.22mm
J1: "CONN HEADER VERT 3POS 2MM", Color=Natural, Contact Resistance=20mR, Current Rating=2A, Housing Color=White, Insulation Resistance=1MR, MANUFACTURER=JST, Max Operating Temperature=85°C, Max Voltage Rating (AC)=100V, Min Operating Temperature=-25°C, Supplier Part Number 1=6478077, Category="Headers and Wire Housings", ComponentLink1Description=https://datasheet.ciiva.com/6747/80560-6747401.pdf?src-supplier=Newark, ComponentLink1URL=https://datasheet.ciiva.com/6747/80560-6747401.pdf?src-supplier=Newark, ComponentLink2Description=https://datasheet.ciiva.com/11746/0900766b80826550-11746939.pdf?src-supplier=RSComponents, ComponentLink2URL=https://datasheet.ciiva.com/11746/0900766b80826550-11746939.pdf?src-supplier=RSComponents, ComponentLink3Description=https://datasheet.ciiva.com/26894/getdatasheetpartid-448114-26894774.pdf?src-supplier=Verical, ComponentLink3URL=https://datasheet.ciiva.com/26894/getdatasheetpartid-448114-26894774.pdf?src-supplier=Verical, ComponentLink4Description=https://datasheet.ciiva.com/712/eph-712455.pdf?src-supplier=Digi-Key, ComponentLink4URL=https://datasheet.ciiva.com/712/eph-712455.pdf?src-supplier=Digi-Key, ComponentLink5Description=https://datasheet.ciiva.com/26924/getdatasheetpartid-651387-26924028.pdf?src-supplier=Verical, ComponentLink5URL=https://datasheet.ciiva.com/26924/getdatasheetpartid-651387-26924028.pdf?src-supplier=Verical, ComponentLink6Description=https://datasheet.ciiva.com/16200/eph-16200926.pdf?src-supplier=Future+Electronics, ComponentLink6URL=https://datasheet.ciiva.com/16200/eph-16200926.pdf?src-supplier=Future+Electronics, ComponentLink7Description=https://datasheet.ciiva.com/43491/741202-da-01-en-stiftleiste-gerade-3-pol-rm2-0-43491962.pdf?src-supplier=Conrad, ComponentLink7URL=https://datasheet.ciiva.com/43491/741202-da-01-en-stiftleiste-gerade-3-pol-rm2-0-43491962.pdf?src-supplier=Conrad, Connector Type="Male Pin", Contact Material=Brass,Tin, Contact Mating Length=0.13inch, Contact Plating=Tin,Copper, Depth=4.5mm, Fastening Type=Detent, Gender=Male, Height=9.4mm, Housing Material=Polyamide, Lead Free="Lead Free", Lead Pitch=2mm, Length=7.9mm, Manufacturer Part Number=B3B-PH-K-S(LF)(SN), Max Current Rating=2A, Max Voltage Rating (DC)=100V, Mount="Through Hole", Number of Contacts=3, Number of Pins=3, Number of Poles=3, Number of Positions=3, Number of Rows=1, Orientation=Straight, Packaging=Bulk, Pitch=2mm, Pricing 1="1=0.07800, 500=0.06750, 1500=0.06580, 5000=0.06400, 15000=0.06240 (USD)", REACH SVHC="No SVHC", RoHS=Yes, Supplier 1="Future Electronics", Termination=Solder, Voltage Rating=100V, Voltage Rating (AC)=100V, Width=4.5mm, Working Voltage=100V
J2: library part "SMD PAD"
J3: "CABLE ADAPTER 6 POS", MANUFACTURER=Tag-Connect, Package Quantity=1, Supplier Part Number 1=TC2030-IDC-ND, ComponentLink1Description=http://www.tag-connect.com/Materials/TC2030-MCP%20Datasheet.pdf?src-supplier=Digi-Key, ComponentLink1URL=http://www.tag-connect.com/Materials/TC2030-MCP%20Datasheet.pdf?src-supplier=Digi-Key, Manufacturer Part Number=TC2030-IDC, Pricing 1="1=43.71 (USD)", Stock 1=284, Supplier 1=Digi-Key
J4: "CONN HEADER VERT 4POS 2MM", Color=Natural, Contact Resistance=20mR, Current Rating=2A, Housing Color=White, Insulation Resistance=1MR, MANUFACTURER=JST, Max Operating Temperature=85°C, Max Voltage Rating (AC)=100V, Min Operating Temperature=-25°C, Supplier Part Number 1=37K9958, Category=Connectors, ComponentLink1Description=https://datasheet.ciiva.com/11747/0900766b8082f552-11747200.pdf?src-supplier=RSComponents, ComponentLink1URL=https://datasheet.ciiva.com/11747/0900766b8082f552-11747200.pdf?src-supplier=RSComponents, ComponentLink2Description=https://datasheet.ciiva.com/712/eph-712488.pdf?src-supplier=Digi-Key, ComponentLink2URL=https://datasheet.ciiva.com/712/eph-712488.pdf?src-supplier=Digi-Key, ComponentLink3Description=https://datasheet.ciiva.com/16209/eph-16209245.pdf?src-supplier=Future+Electronics, ComponentLink3URL=https://datasheet.ciiva.com/16209/eph-16209245.pdf?src-supplier=Future+Electronics, ComponentLink4Description=https://datasheet.ciiva.com/43491/741223-da-01-en-stiftleiste-gerade-4-pol-rm2-0-43491964.pdf?src-supplier=Conrad, ComponentLink4URL=https://datasheet.ciiva.com/43491/741223-da-01-en-stiftleiste-gerade-4-pol-rm2-0-43491964.pdf?src-supplier=Conrad, Connector Type="Male Pin", Contact Material=Brass,Tin, Contact Mating Length=0.13inch, Contact Plating=Tin,Copper, Depth=4.5mm, Fastening Type=Detent, Gender=Male, Height=9.4mm, Housing Material=Polyamide, Lead Free="Lead Free", Lead Pitch=2mm, Length=9.9mm, Manufacturer Part Number=B4B-PH-K-S(LF)(SN), Material=Polyamide, Max Current Rating=2A, Max Voltage Rating (DC)=100V, Mount="Through Hole", Number of Contacts=4, Number of Pins=4, Number of Poles=4, Number of Positions=4, Number of Rows=1, Orientation=Straight, Packaging=Bulk, Pitch=2mm, REACH SVHC="No SVHC", RoHS=Yes, Supplier 1=Newark, Termination=Solder, Voltage Rating=100V, Voltage Rating (AC)=100V, Width=4.5mm, Working Voltage=100V
J5: "CONN U.FL RCPT STR 50 OHM SMD", Case/Package=SMD/SMT, MANUFACTURER=Hirose, Package Quantity=10000, Supplier Part Number 1=U.FL-R-SMT-1(80)-CUTT, ComponentLink1Description=https://www.hirose.com/product/en/download_file/key_name/U.FL-R-SMT-1%2880%29/category/Specification%20Sheet/doc_file_id/37638/?file_category_id=9&item_id=03310472280&is_series=&src-supplier=Digi-Key, ComponentLink1URL=https://www.hirose.com/product/en/download_file/key_name/U.FL-R-SMT-1%2880%29/category/Specification%20Sheet/doc_file_id/37638/?file_category_id=9&item_id=03310472280&is_series=&src-supplier=Digi-Key, ComponentLink2Description=http://www.mouser.com/ds/2/185/U.FL_catalog-939761.pdf?src-supplier=Mouser, ComponentLink2URL=http://www.mouser.com/ds/2/185/U.FL_catalog-939761.pdf?src-supplier=Mouser, Lead Free="Lead Free", Manufacturer Part Number=U.FL-R-SMT-1(80), Packaging="Tape and Reel", Pricing 1="1=1.07, 500=0.785, 1500=0.74, 2500=0.72, 5000=0.695 (USD)", Stock 1=1272, Supplier 1="Future Electronics"
L1: library part SRN5040TA-100M, "Ind Power Wirewound 10uH 20% Ferrite Core T/R", Case/Package=Nonstandard, Current Rating=2.2A, DC Resistance (DCR)=56mR, Inductance=10uH, MANUFACTURER=Bourns, Max Operating Temperature=125°C, Min Operating Temperature=-55°C, Ratings=AEC-Q200, Resistor Type=Wirewound, Saturation Current=2.52A, Self Resonant Frequency=26MHz, Supplier Part Number 1=SRN5040TA-100MCT-ND, Test Frequency=100kHz, Tolerance=20%, Category="Fixed Inductors", ComponentLink1Description=http://www.farnell.com/datasheets/2675147.pdf?src-supplier=Farnell, ComponentLink1URL=http://www.farnell.com/datasheets/2675147.pdf?src-supplier=Farnell, ComponentLink2Description=https://www.bourns.com/docs/Product-Datasheets/SRN5040TA.pdf?src-supplier=Digi-Key, ComponentLink2URL=https://www.bourns.com/docs/Product-Datasheets/SRN5040TA.pdf?src-supplier=Digi-Key, ComponentLink3Description=http://www.farnell.com/datasheets/2675147.pdf?src-supplier=Newark, ComponentLink3URL=http://www.farnell.com/datasheets/2675147.pdf?src-supplier=Newark, Core Material=Ferrite, Manufacturer Part Number=SRN5040TA-100M, Mount="Surface Mount", Packaging="Cut Tape", Pricing 1="1=0.52000, 10=0.45500, 25=0.42240, 50=0.35760, 100=0.32500, 250=0.30552, 500=0.27300 (USD)", RoHS=No, Shielding=Shielded, Stock 1=1454, Supplier 1=Digi-Key
L2: library part SRU8028-220Y, "FIXED IND 22UH 1.6A 106 MOHM SMD", Case/Package=8028, Current=2.8A, Current Rating=1.6A, DC Resistance (DCR)=106mR, Inductance Tolerance=30%, MANUFACTURER=Bourns, Max Operating Temperature=125°C, Min Operating Temperature=-40°C, Package Quantity=1500, Resistor Type=Wirewound, Saturation Current=1.5A, Self Resonant Frequency=20MHz, Supplier Part Number 1=SRU8028-220YCT-ND, Test Frequency=100kHz, Category="Fixed Inductors", ComponentLink1Description=https://datasheet.ciiva.com/3866/41849355s8208904n1506-3866094.pdf?src-supplier=Avnet, ComponentLink1URL=https://datasheet.ciiva.com/3866/41849355s8208904n1506-3866094.pdf?src-supplier=Avnet, ComponentLink2Description=https://datasheet.ciiva.com/3866/41849355s8208904n1506-3866094.pdf?src-supplier=Arrow+Electronics, ComponentLink2URL=https://datasheet.ciiva.com/3866/41849355s8208904n1506-3866094.pdf?src-supplier=Arrow+Electronics, ComponentLink3Description=https://datasheet.ciiva.com/7848/sru8028-7848101.pdf?src-supplier=Element14, ComponentLink3URL=https://datasheet.ciiva.com/7848/sru8028-7848101.pdf?src-supplier=Element14, ComponentLink4Description=https://datasheet.ciiva.com/6691/sru8028-6691830.pdf?src-supplier=Digi-Key, ComponentLink4URL=https://datasheet.ciiva.com/6691/sru8028-6691830.pdf?src-supplier=Digi-Key, ComponentLink5Description=https://datasheet.ciiva.com/7848/1776946-7848102.pdf?src-supplier=Element14, ComponentLink5URL=https://datasheet.ciiva.com/7848/1776946-7848102.pdf?src-supplier=Element14, ComponentLink6Description=https://datasheet.ciiva.com/6691/sru8028-6691834.pdf?src-supplier=Digi-Key, ComponentLink6URL=https://datasheet.ciiva.com/6691/sru8028-6691834.pdf?src-supplier=Digi-Key, ComponentLink7Description=https://datasheet.ciiva.com/6691/sru8028-6691836.pdf?src-supplier=Digi-Key, ComponentLink7URL=https://datasheet.ciiva.com/6691/sru8028-6691836.pdf?src-supplier=Digi-Key, ComponentLink8Description=https://datasheet.ciiva.com/6161/sru8028-6161214.pdf?src-supplier=Farnell, ComponentLink8URL=https://datasheet.ciiva.com/6161/sru8028-6161214.pdf?src-supplier=Farnell, ComponentLink9Description=https://datasheet.ciiva.com/17285/sru8028-17285550.pdf?src-supplier=Avnet+Europe, ComponentLink9URL=https://datasheet.ciiva.com/17285/sru8028-17285550.pdf?src-supplier=Avnet+Europe, Core Material=Ferrite, DC Current=1.6A, Depth=8.3mm, Height=2.8mm, Height - Seated (Max)=0.122inch, Inductance=22uH, Length=0.315inch, Manufacturer Part Number=SRU8028-220Y, Max DC Current=1.6A, Military Standard=Not, Mount="Surface Mount", Number of Pins=2, Packaging="Tape and Reel", Pricing 1="1=0.92000, 10=0.85800, 25=0.79200, 50=0.66000, 100=0.62040, 250=0.55440, 500=0.47520 (USD)", Q Factor=22, REACH SVHC="No SVHC", RMS Current (Irms)=1.6A, RoHS=Yes, RoHS Compliant=Yes, Series=SRU8028, Shielding=Shielded, Stock 1=1920, Supplier 1=Digi-Key, Termination=SMD/SMT, Tolerance=30%, Width=0.315inch
L3: library part HLC021R6BTTR, "FIXED IND 1.6NH 660MA 150 MOHM", Case/Package=0402, Case Code (Metric)=1005, Current Rating=660mA, DC Resistance (DCR)=150mR, MANUFACTURER="Kyocera AVX", Max Operating Temperature=125°C, Min Operating Temperature=-55°C, Package Quantity=5000, Self Resonant Frequency=18GHz, Supplier Part Number 1=478-HLC021R6BTCT-ND, Test Frequency=450MHz, Case Code (Imperial)=0402, ComponentLink1Description=https://media.digikey.com/pdf/Data%20Sheets/AVX%20PDFs/MLO%20High%20Current%20Inductors.pdf?src-supplier=Digi-Key, ComponentLink1URL=https://media.digikey.com/pdf/Data%20Sheets/AVX%20PDFs/MLO%20High%20Current%20Inductors.pdf?src-supplier=Digi-Key, ComponentLink2Description=http://www.avx.com/docs/catalogs/mlohighcurrentinductor.pdf?src-supplier=Future+Electronics, ComponentLink2URL=http://www.avx.com/docs/catalogs/mlohighcurrentinductor.pdf?src-supplier=Future+Electronics, Core Material=Non-Magnetic, Depth=0.66mm, Height=0.35mm, Height - Seated (Max)=0.018inch, Inductance=1.6nH, Lead Free="Lead Free", Length=1mm, Manufacturer Part Number=HLC021R6BTTR, Max DC Current=660mA, Mount="Surface Mount", Packaging="Tape and Reel", Pricing 1="1=0.41, 10=0.36, 25=0.3152, 50=0.2704, 100=0.2478, 250=0.22524, 500=0.21174, 1000=0.16218, 2500=0.15317 (USD)", Q Factor=25, Radiation Hardening=No, REACH SVHC="No SVHC", Shielding=Unshielded, Stock 1=5000, Supplier 1=Digi-Key, Termination=SMD/SMT, Width=0.023inch
LED2: "Led White Clear 0603 SMD", Case/Package=0603, Case Code (Metric)=1608, Color=White, Forward Voltage=3V, Lens Color=Clear, MANUFACTURER=Inolux, Supplier Part Number 1=1830-1063-1-ND, Test Current=5mA, Case Code (Imperial)=0603, Category=LEDs, ComponentLink1Description=http://www.inolux-corp.com/datasheet/SMDLED/Mono%20Color%20Top%20View/IN-S63AT%20Series_V1.1.pdf?src-supplier=Digi-Key, ComponentLink1URL=http://www.inolux-corp.com/datasheet/SMDLED/Mono%20Color%20Top%20View/IN-S63AT%20Series_V1.1.pdf?src-supplier=Digi-Key, Height=0.4mm, Length=1.6mm, Lens Size=0.8mm, Lens Style=Flat, Lens Transparency=Clear, Luminous Intensity=900mcd, Manufacturer Part Number=IN-S63AT5UW, Mount="Surface Mount", Packaging="Tape and Reel", Pricing 1="1=0.33000, 10=0.17700, 100=0.08210, 500=0.07576, 1000=0.05934, 2000=0.05808 (USD)", RoHS=No, Stock 1=275915, Supplier 1=Digi-Key, Viewing Angle=120°, Width=0.8mm